# Altium PCB smart_pill_box.PcbDoc
Units mm, origin at the board's own origin, x right, y up, seen from the top; angles counter-clockwise.
Board outline 85 x 60 mm, 2 copper layers (Top Layer, Bottom Layer); 103 components, 78 nets, 376 pads, 0 vias.
Unrouted connection lines stored in the file: 227.
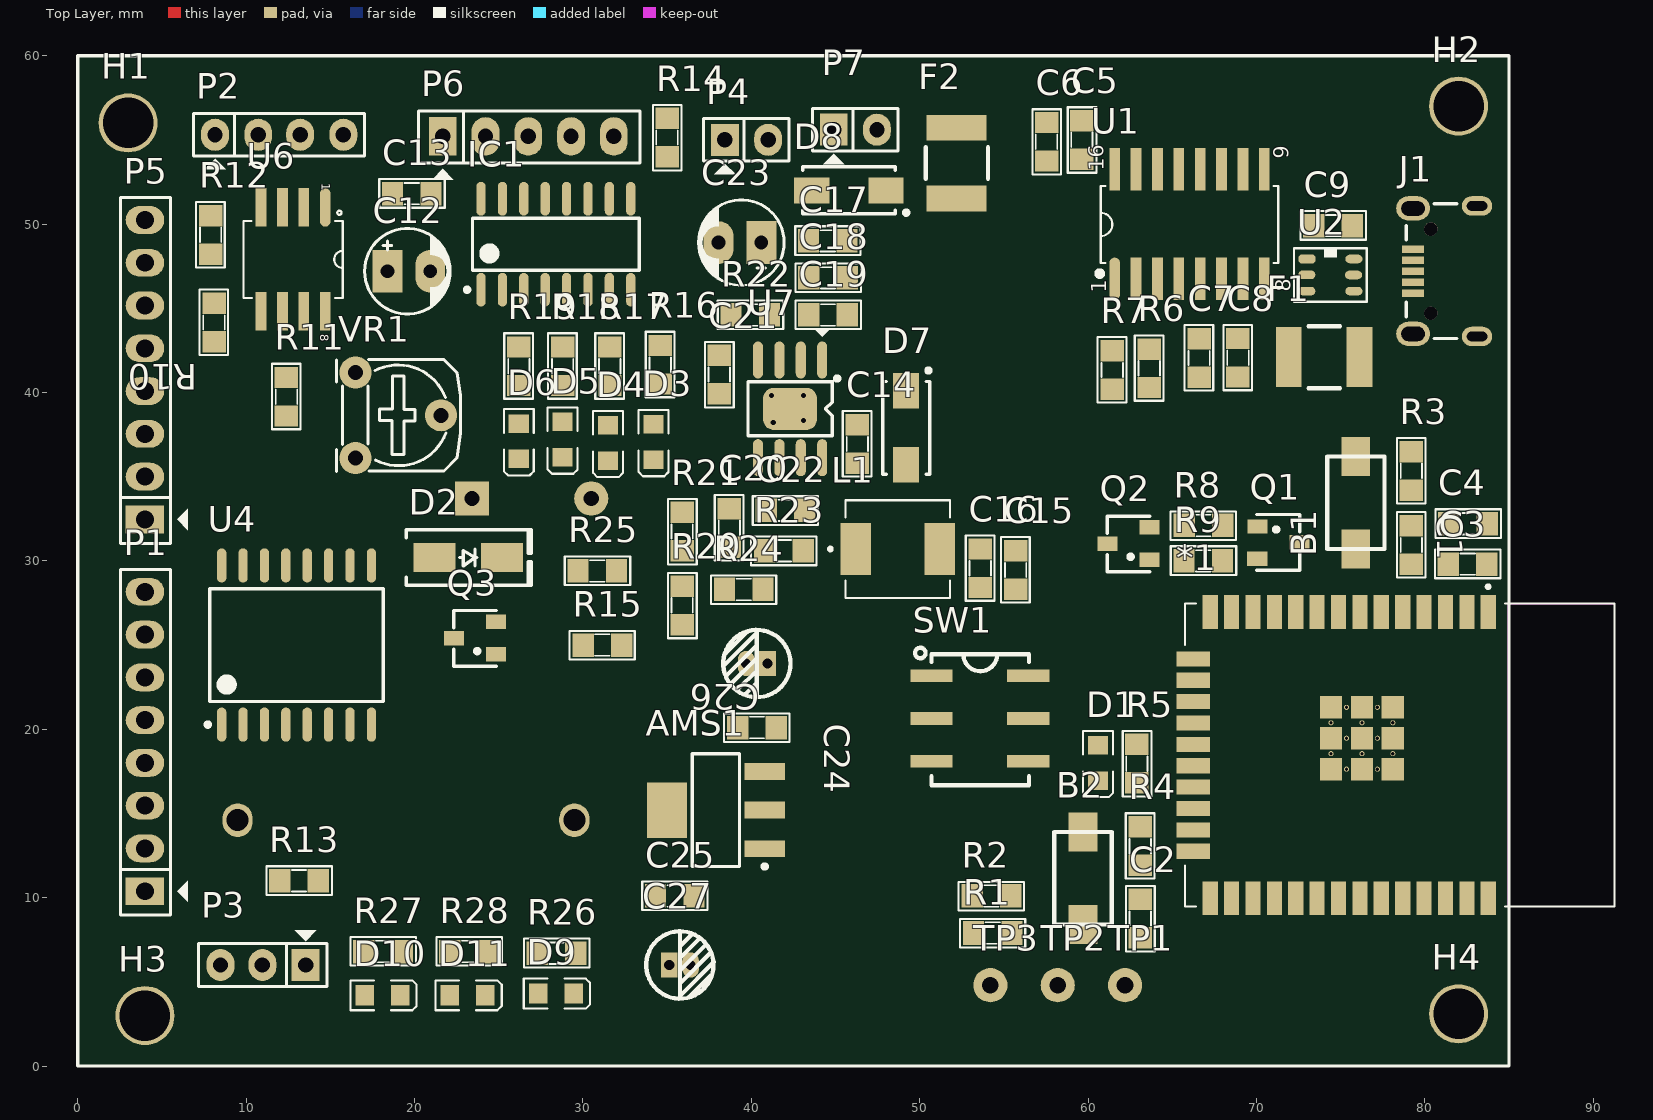
[diagram p0: Top Layer view]
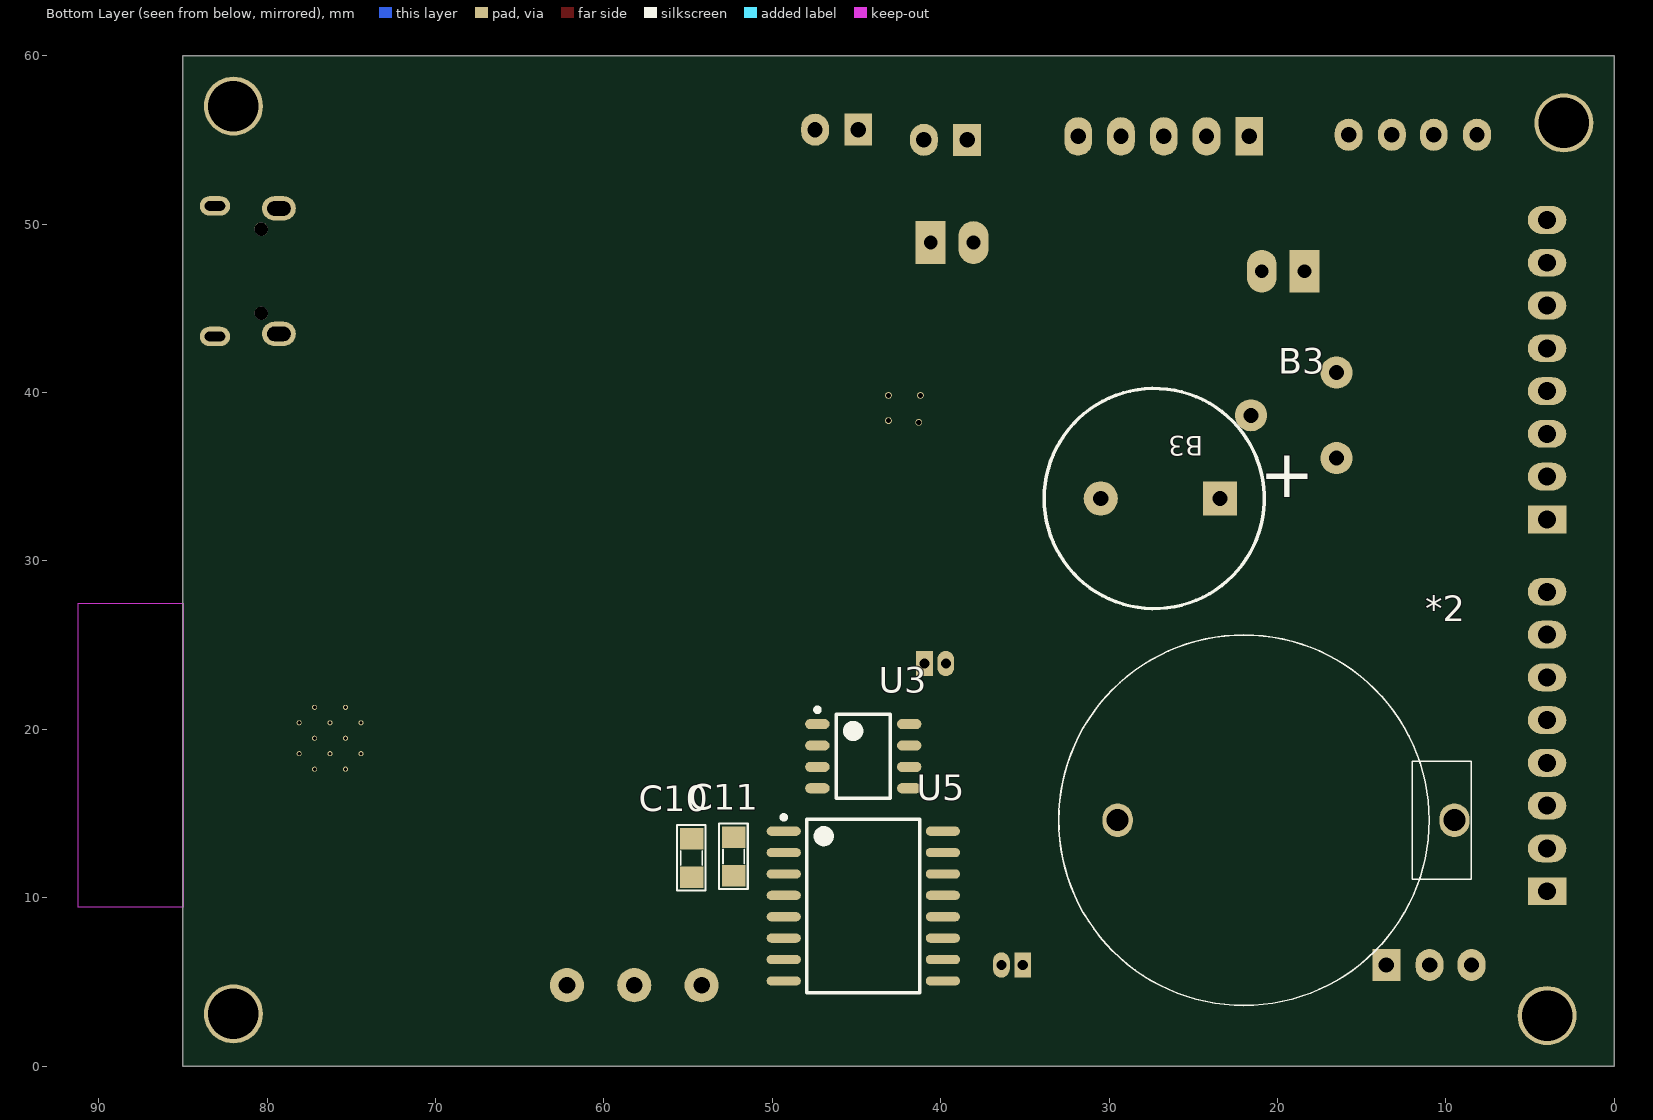
[diagram p1: Bottom Layer view, seen from below]

## Layer stack, top to bottom
Top Solder: solder mask 0.0102, Solder Resist, Dk 3.5
Top Layer: signal copper 0.0356
Dielectric 1: dielectric 0.32, FR-4, Dk 4.8
Bottom Layer: signal copper 0.0356
Bottom Solder: solder mask 0.0102, Solder Resist, Dk 3.5

## Board outline
0,0 85,0 85,60 0,60

## Design rules (kind name [scope] priority, off if disabled: settings)
Clearance [All] p1: gap=0.254 ignorepadtopadclearanceinfootprint=FALSE except(0: Arc-Hole Track-Hole SMDPad-Hole THPad-Hole Via-Hole Fill-Hole Poly-Hole Region-Hole Text-Hole)
DiffPairsRouting [All] p1: maxlimit=0.254 minlimit=0.254 mostfreqgap=0.254 toplayer_minwidth=0.381 toplayer_maxwidth=0.381 toplayer_prefwidth=0.381 bottomlayer_minwidth=0.381 bottomlayer_maxwidth=0.381 bottomlayer_prefwidth=0.381 maxuncoupledlength=12.7
PolygonConnect [All] p1: connectstyle=Relief reliefconductorwidth=0.254 reliefentries=4 polygonreliefangle="90 Angle" airgapwidth=0.254
RoutingVias [All] p1: holewidth=0.711 width=1.27 viastyle="Through Hole" minholewidth=0.711 minwidth=1.27 maxholewidth=0.711 maxwidth=1.27
SolderMaskExpansion [All] p1: expansion=0.102 istentingtop=FALSE
Width [All] p1: maxlimit=0.254 minlimit=0.254 preferedwidth=0.254
29 further rules are at their usual default settings.

## Classes and differential pairs
component class USB: C5 C6 C7 C8 C9 F1 J1 Q1 Q2 R6 R7 R8 R9 U1 U2
component class Power: AMS1 C14 C15 C16 C17 C18 C19 C20 C21 C22 C23 C25 C27 D7 D8 D9 D10 D11 F2 L1 P7 R20 R21 R22 R23 R24 R25 R26 R27 R28 SW1 U7
component class Output: B3 C12 C13 D2 D3 D4 D5 D6 IC1 P4 P5 P6 Q3 R14 R15 R16 R17 R18 R19
component class Input: *2 C10 C11 H1 H2 H3 H4 P1 P2 P3 R10 R11 R12 R13 U3 U4 U5 U6 VR1
component class ESP32: *1 B1 B2 C1 C2 C3 C4 D1 R1 R2 R3 R4 R5 TP1 TP2 TP3
differential pair D: +D_P -D_N

## Components (designator, comment, footprint, x,y, rotation, side; value= is the part's Value field where it differs from the comment)
*1 "ESP32 WROOM 32" ESP32-WROOM-32D 78.505,18.465 r270 top
*2 "CR-2032" CR-2032 22,14.6 r180 bottom
AMS1 "AMS1117-3.3V" SOT223 37.9,15.2 r90 top value="AMS1117-3.3V SOT223"
B1 "Button SMD 2 Pin 3x4mm" "BUTTON SMD 2 PIN" 75.9,30.7 r90 top
B2 "Button SMD 2 Pin 3x4mm" "BUTTON SMD 2 PIN" 59.7,8.4 r90 top
B3 "Buzzer" BUZZER 25.42,33.7 r0 bottom
C1 "Cap Non-Pol SMD" CAP-SM-0805 79.2,32.086 r270 top value=100nF/16V
C2 "Cap Non-Pol SMD" CAP-SM-0805 63.1,7.614 r90 top value=100nF/16V
C3 "Cap Non-Pol SMD" CAP-SM-0805 83.686,29.8 r180 top value=22uF/6.3V
C4 "Cap Non-Pol SMD" CAP-SM-0805 83.7,32.2 r180 top value=100nF/25V
C5 "Cap Non-Pol SMD" CAP-SM-0805 59.635,53.857 r90 top value=22uF/25V
C6 "Cap Non-Pol SMD" CAP-SM-0805 57.535,53.743 r90 top value=100nF/25V
C7 "Cap Non-Pol SMD" CAP-SM-0805 66.6,43.186 r270 top value=22uF/25V
C8 "Cap Non-Pol SMD" CAP-SM-0805 68.9,43.2 r270 top value=100nF/25V
C9 "Cap Non-Pol SMD" CAP-SM-0805 75.7,49.9 r180 top value=100nF/25V
C10 "Cap Non-Pol SMD" CAP-SM-0805 54.8,13.5 r270 bottom value=22uF/25V
C11 "Cap Non-Pol SMD" CAP-SM-0805 52.3,13.586 r270 bottom value=100nF/25V
C12 "Cap Pol" CP1/2 18.4,47.2 r0 top value=47uF
C13 "Cap Non-Pol SMD" CAP-SM-0805 20.986,51.8 r180 top value=0.1uF/25V
C14 "Cap Non-Pol SMD" CAP-SM-0805 46.3,38.086 r270 top value=0.1uF/16V
C15 "Cap Non-Pol SMD" CAP-SM-0805 55.7,30.6 r270 top value=33uF/6.3V
C16 "Cap Non-Pol SMD" CAP-SM-0805 53.6,30.7 r270 top value=33uF/6.3V
C17 "Cap Non-Pol SMD" CAP-SM-0805 45.686,49 r180 top value=4.7uF/50V
C18 "Cap Non-Pol SMD" CAP-SM-0805 45.7,46.8 r180 top value=4.7uF/50V
C19 "Cap Non-Pol SMD" CAP-SM-0805 45.7,44.6 r180 top value=10pF/50V
C20 "Cap Non-Pol SMD" CAP-SM-0805 38.7,33.1 r270 top value=4.7nF/50V
C21 "Cap Non-Pol SMD" CAP-SM-0805 38.1,39.914 r90 top value=10nF/50V
C22 "Cap Non-Pol SMD" CAP-SM-0805 40.9,33 r0 top value=39pF/50V
C23 "Cap Pol" CP1/2 40.6,48.9 r180 top value=100pF
C24 "Cap Non-Pol SMD" CAP-SM-0805 39.2,20.1 r0 top value=1uF/50V
C25 "Cap Non-Pol SMD" CAP-SM-0805 36.6,10.1 r180 top value=1uF/50V
C26 "10uF" "tu hoa 4mm" 40.335,23.9 r180 top
C27 "10uF" "tu hoa 4mm" 35.765,6 r0 top
D1 "LED SMD" LED_0805_Blue 60.6,18 r270 top
D2 "SS34" "DIODE SMA" 23.2,30.2 r0 top
D3 "LED SMD" LED_0805_Blue 34.2,37.05 r270 top
D4 "LED SMD" LED_0805_Blue 31.5,37 r270 top
D5 "LED SMD" LED_0805_Blue 28.8,37.2 r270 top
D6 "LED SMD" LED_0805_Blue 26.2,37.1 r270 top
D7 "D Schottky" SS34 49.2,37.9 r270 top
D8 "D Schottky" SS34 45.8,52 r180 top
D9 "LED SMD" LED_0805_Blue 28.4,4.3 r0 top
D10 "LED SMD" LED_0805_Blue 18.1,4.2 r0 top
D11 "LED SMD" LED_0805_Blue 23.15,4.2 r0 top
F1 "6V, 1.5A" Fuse_SMD_1812 74,42.1 r180 top value="24V, 1.5A"
F2 "16V, 1.5A" Fuse_SMD_1812 52.2,53.6 r270 top value="24V, 1.5A"
H1 "Hole" "LO KHOAN 3MM" 3,56 r0 top
H2 "Hole" "LO KHOAN 3MM" 82,57 r0 top
H3 "Hole" "LO KHOAN 3MM" 4,3 r0 top
H4 "Hole" "LO KHOAN 3MM" 82,3.1 r0 top
IC1 "ULN2003" "SOP 16" 28.4,48.8 r90 top
J1 "Micro USB 2.0 Type B" 629105150521 82.2,47.2 r90 top
L1 "6.8uH/4.4A" "CUON CAM SMD 0530" 48.7,30.7 r0 top
P1 "Header 8" JP8 4,10.38 r90 top
P2 "Header 4" JP4 10.7,55.3 r0 top
P3 "HALL SENSOR" JP3 11,6 r180 top
P4 "Header 2" JP2 38.435,55 r0 top
P5 "Header 8" JP8 4,32.46 r90 top
P6 "Header 5" JP5 21.68,55.2 r0 top
P7 "Header 2" JP2 44.9,55.6 r0 top
Q1 "BC817" SOT-23 71.3,31.1 r270 top value=C9014
Q2 "BC817" SOT-23 62.4,31 r90 top value=C9014
Q3 "HF" SOT-23 23.6,25.4 r90 top value=C9014
R1 "RESISTOR SMD" RES-SM-0805 53.2,7.9 r0 top value=10K/1%
R2 "RESISTOR SMD" RES-SM-0805 53.114,10.1 r0 top value=10K/1%
R3 "RESISTOR SMD" RES-SM-0805 79.2,36.486 r270 top value=10K/1%
R4 "RESISTOR SMD" RES-SM-0805 63.1,14.2 r270 top value=10K/1%
R5 "RESISTOR SMD" RES-SM-0805 62.9,16.814 r90 top value=1k/1%
R6 "RESISTOR SMD" RES-SM-0805 63.635,42.575 r270 top value=22/1%
R7 "RESISTOR SMD" RES-SM-0805 61.435,42.475 r270 top value=22/1%
R8 "RESISTOR SMD" RES-SM-0805 65.714,32.1 r0 top value=10K/1%
R9 "RESISTOR SMD" RES-SM-0805 67.986,30 r180 top value=10K/1%
R10 "RESISTOR SMD" RES-SM-0805 8.1,45.3 r270 top value=10k/1%
R11 "RESISTOR SMD" RES-SM-0805 12.4,40.886 r270 top value=10k/1%
R12 "RESISTOR SMD" RES-SM-0805 7.9,50.5 r270 top value=330/1%
R13 "RESISTOR SMD" RES-SM-0805 14.286,11 r180 top value=10k/1%
R14 "RESISTOR SMD" RES-SM-0805 35,54 r90 top value=1k/1%
R15 "RESISTOR SMD" RES-SM-0805 30.014,25 r0 top value=10K/1%
R16 "RESISTOR SMD" RES-SM-0805 34.6,42.786 r270 top value=1k/1%
R17 "RESISTOR SMD" RES-SM-0805 31.6,42.7 r270 top value=1k/1%
R18 "RESISTOR SMD" RES-SM-0805 28.8,42.7 r270 top value=1k/1%
R19 "RESISTOR SMD" RES-SM-0805 26.2,42.7 r270 top value=1k/1%
R20 "RESISTOR SMD" RES-SM-0805 35.9,26.214 r90 top value=2.49k/1%
R21 "RESISTOR SMD" RES-SM-0805 35.9,30.6 r90 top value=49.9k/1%
R22 "RESISTOR SMD" RES-SM-0805 41.086,44.6 r180 top value=100K/1%
R23 "RESISTOR SMD" RES-SM-0805 40.8,30.6 r0 top value=30K/1%
R24 "RESISTOR SMD" RES-SM-0805 38.414,28.3 r0 top value=10k/1%
R25 "RESISTOR SMD" RES-SM-0805 32,29.4 r180 top value=20K/1%
R26 "RESISTOR SMD" RES-SM-0805 29.586,6.7 r180 top value=1k/1%
R27 "RESISTOR SMD" RES-SM-0805 19.286,6.8 r180 top value=1k/1%
R28 "RESISTOR SMD" RES-SM-0805 24.386,6.8 r180 top value=1k/1%
SW1 "2P2T - DPDT" SW_2P2T-DPDT_SMD 50.7,23.18 r270 top
TP1 "Test Point" TP 62.2,4.8 r0 top
TP2 "Test Point" TP 58.2,4.8 r0 top
TP3 "Test Point" TP 54.2,4.8 r0 top
U1 "CH340C" SOIC16_50_284_25X90_SMT 66,50 r90 top
U2 "USBLC6-2SC6 TVS" SOT23-6 74.5,47.1 r0 top
U3 "AT24C32" LM555CMX 44.6,18.4 r180 bottom value=LM555CMX
U4 "PCF8574" "SOIC 16" 13,25 r90 top
U5 "DS3231 SMD" "SOIC 16" 44.6,9.5 r180 bottom
U6 "LM393DT" SOIC8_50_328_25X90_SMT 12.8,47.9 r270 top
U7 "TPS54331" "SO-8 TSP5430D" 42.307,39.024 r270 top
VR1 "10K" "Bien Tro Tam Giac Dung" 16.5,41.18 r270 top

## Footprints (in the part's own frame and the unit in brackets; to place one, negate y for a bottom-side part, rotate by r counter-clockwise, add the part's x,y. Pads: shape width x height; smd on the part's side, far side on the other; paste and mask are expansions set on the pad)
629105150521 [mm] "Micro USB 2.0 SMT Type B Horizontal 5 Contacts High Current"
  rect 0.45x1.3 smd: 1(-1.3,2.9) 2(-0.65,2.9) 3(0,2.9) 4(0.65,2.9) 5(1.3,2.9)
  round 0.8 hole 0.8 unplated: MH1(-2.5,1.85) MH2(2.5,1.85)
  oval 1.15x1.8 hole 0.55 slot 1.2 at 90 deg: Shell(-3.875,-0.9) Shell(3.875,-0.9)
  oval 1.45x2 hole 0.85 slot 1.4 at 90 deg: Shell(-3.725,2.9) Shell(3.725,2.9)
  silkscreen extent -4,0.3 4,3.3, body extent -4,-3.3 4,3.3, height 2.75
"Bien Tro Tam Giac Dung" [mil] "RM065"
  round 75 hole 35: 1(0,0) 2(100,200) 3(200,0)
  silkscreen extent -31,-44 231,246, body extent -28,-50 228,228, height 279
"BUTTON SMD 2 PIN" [mm] "Button SMD 2 Pin 3x4mm"
  rect 2.3x1.7 smd: 1(0,0) 2(5.5,0)
  silkscreen extent 0,-1.7 5.5,1.7, body extent 0.24,-1.48 5.24,1.42, height 2
BUZZER [mil]
  rect 80x80 hole 36: 1(-78.73,0)
  round 80 hole 36: 2(200,0)
  silkscreen extent -182,-257 332,257
CAP-SM-0805 [mil]
  rect 50x55 smd: 1(0,0) 2(90,0)
  silkscreen extent -32,-34 121,33, body extent 6,-25 84,25, height 31
CP1/2 [mil] "Tu hoa < 22uF/16>50V"
  rect 70x100 hole 32: 1(0,0)
  oval 70x100 hole 32: 2(100,0)
  silkscreen extent -53,-100 147,100, body extent -49,-99 149,99, height 287
CR-2032 [mm] "CR-2032 Holder"
  oval 1.8x2 hole 1.3: 1(-7.5,0) 2(12.5,0)
  silkscreen extent -11,-11 13.5,11, body extent -11,-11 13.5,11, height 8.51
"CUON CAM SMD 0530" [mm] "CUON CAM SMD 0530"
  rect 1.8x3.1 smd: 1(-2.5,0) 2(2.5,0)
  silkscreen extent -4.1,-2.9 3.1,2.9, body extent -3.1,-2.88 3.1,2.92, height 3
"DIODE SMA" [mm] "SMA"
  rect 2.5x1.7 smd: 1(-2,0) 2(2,0)
  silkscreen extent -3.68,-1.65 3.75,1.65, body extent -2.6,-1.37 2.6,1.37, height 2.4
ESP32-WROOM-32D [mm]
  rect 2x0.9 smd: 1(-8.5,5.26) 2(-8.5,3.99) 3(-8.5,2.72) 4(-8.5,1.45) 5(-8.5,0.18) 6(-8.5,-1.09) 7(-8.5,-2.36) 8(-8.5,-3.63) 9(-8.5,-4.9) 10(-8.5,-6.17) 11(-8.5,-7.44) 12(-8.5,-8.71) 13(-8.5,-9.98) 14(-8.5,-11.25) 25(8.5,-11.25) 26(8.5,-9.98) 27(8.5,-8.71) 28(8.5,-7.44) 29(8.5,-6.17) 30(8.5,-4.9) 31(8.5,-3.63) 32(8.5,-2.36) 33(8.5,-1.09) 34(8.5,0.18) 35(8.5,1.45) 36(8.5,2.72) 37(8.5,3.99) 38(8.5,5.26)
  rect 0.9x2 smd: 15(-5.715,-12.25) 16(-4.445,-12.25) 17(-3.175,-12.25) 18(-1.905,-12.25) 19(-0.635,-12.25) 20(0.635,-12.25) 21(1.905,-12.25) 22(3.175,-12.25) 23(4.445,-12.25) 24(5.715,-12.25)
  rect 1.33x1.33 smd: 39(-2.835,-0.405) 39(-2.835,-2.24) 39(-2.835,-4.075) 39(-1,-0.405) 39(-1,-2.24) 39(-1,-4.075) 39(0.835,-0.405) 39(0.835,-2.24) 39(0.835,-4.075)
  round 0.3 hole 0.2: 39(-2.835,-1.322) 39(-2.835,-3.157) 39(-1.917,-0.405) 39(-1.917,-2.24) 39(-1.917,-4.075) 39(-1,-1.322) 39(-1,-3.157) 39(-0.082,-0.405) 39(-0.082,-2.24) 39(-0.082,-4.075) 39(0.835,-1.322) 39(0.835,-3.157)
  Keep-Out Layer region: 9,6.45 -9,6.45 -9,12.75 9,12.75
  Keep-Out Layer region: 9,6.45 -9,6.45 -9,12.75 9,12.75
  silkscreen extent -10.1,-12.75 9,12.75, body extent -9,-12.62 9,12.88, height 3.2
Fuse_SMD_1812 [mil] "Fuse SMD, size 1812"
  rect 60x140 smd: 0(-83.41,0) 1(82,0)
  silkscreen extent -38,-72 36,73, body extent -93,-67 93,67, height 18
JP2 [mil]
  rect 65x75 hole 36: 1(0,0)
  oval 65x75 hole 36: 2(101,0)
  silkscreen extent -50,-81 150,50, body extent -48,-50 148,48, height 323
JP3 [mil] "Jumper 3"
  rect 65x75 hole 36: 1(-100,0)
  oval 65x75 hole 36: 2(1,0) 3(99,0)
  silkscreen extent -150,-81 150,50, body extent -150,-60 150,55, height 355
JP4 [mil] "Jumper 4"
  oval 65x75 hole 36: 1(-100,0) 2(1,0) 3(99,0) 4(200,0)
  silkscreen extent -150,-81 250,50, body extent -148,-48 248,50, height 323
JP5 [mil] "JP5"
  rect 65x90 hole 36: 1(0,0)
  oval 65x90 hole 36: 2(100,0) 3(200,0) 4(300,0) 5(400,0)
  silkscreen extent -57,-101 461,60, body extent -48,-53 448,45, height 323
JP8 [mil] "JP8"
  rect 65x90 hole 42: 1(0,0)
  oval 65x90 hole 42: 2(100,0) 3(200,0) 4(300,0) 5(400,0) 6(500,0) 7(600,0) 8(700,0)
  silkscreen extent -56,-100 752,57, body extent -48,-50 748,48, height 323
LED_0805_Blue [mm] "Chip LED, 2-Leads, Body 2.0x1.3mm, IPC Medium Density"
  rect 1.1x1.2 smd: 1(-1.05,0) 2(1.05,0)
  silkscreen extent -1.91,-0.89 2.03,0.89, body extent -1,-0.63 1,0.62, height 0.68
LM555CMX [mm] "SOIC, 8-Leads, Body 4.91x3.90mm, Pitch 1.27mm, IPC Medium Density"
  oval 1.45x0.6 smd: 1(-2.725,1.905) 2(-2.725,0.635) 3(-2.725,-0.635) 4(-2.725,-1.905) 5(2.725,-1.905) 6(2.725,-0.635) 7(2.725,0.635) 8(2.725,1.905)
  silkscreen extent -2.85,-2.5 1.6,2.88, body extent -3,-2.5 3,2.5, height 1.35
"LO KHOAN 3MM" [mil]
  round 138 hole 118.1: 1(0,0)
RES-SM-0805 [mil]
  rect 50x55 smd: 1(0,0) 2(90,0)
  silkscreen extent -32,-34 121,33, body extent 6,-25 84,25, height 31
"SO-8 TSP5430D" [mm] "8-Pin Small Outline Integrated Circuit 1.27 mm Pitch, IPC Medium Density"
  oval 2.2x0.6 smd: 1(-2.9,1.905) 2(-2.9,0.635) 3(-2.9,-0.635) 4(-2.9,-1.905) 5(2.9,-1.905) 6(2.9,-0.635) 7(2.9,0.635) 8(2.9,1.905)
  round 0.4 hole 0.3: 9(-0.8,0.8) 9(-0.8,-1.1) 9(0.7,0.8) 9(0.8,-1)
  rrect50% 2.5x3.2 smd: 9(0,0)
  silkscreen extent -4.8,-2.5 1.6,2.93, body extent -2.89,-2.43 3.15,2.59, height 1.6
SOIC8_50_328_25X90_SMT [mil] "SOIC"
  oval 90x25 smd mask+3: 1(-121.32,75)
  rect 90x25 smd mask+3: 2(-121.32,25) 3(-121.32,-25) 4(-121.32,-75) 5(121.32,-75) 6(121.32,-25) 7(121.32,25) 8(121.32,75)
  silkscreen extent -114,-116 90,116, body extent -121,-98 121,98, height 79
SOIC16_50_284_25X90_SMT [mm]
  oval 2.5x0.635 smd mask+0.076: 1(-3.25,4.42)
  rect 2.5x0.635 smd mask+0.076: 2(-3.25,3.15) 3(-3.25,1.88) 4(-3.25,0.61) 5(-3.25,-0.66) 6(-3.25,-1.93) 7(-3.25,-3.2) 8(-3.25,-4.47) 9(3.25,-4.47) 10(3.25,-3.2) 11(3.25,-1.93) 12(3.25,-0.66) 13(3.25,0.61) 14(3.25,1.88) 15(3.25,3.15) 16(3.25,4.42)
  silkscreen extent -3.07,-5.3 2.26,5.44, body extent -3.02,-4.97 2.98,4.93, height 1.4
"SOIC 16" [mm] "SOIC, 16-Leads, Body 10.30x7.50mm, Pitch 1.27mm, IPC Medium Density"
  oval 2.032x0.55 smd: 1(-4.725,4.445) 2(-4.725,3.175) 3(-4.725,1.905) 4(-4.725,0.635) 5(-4.725,-0.635) 6(-4.725,-1.905) 7(-4.725,-3.175) 8(-4.725,-4.445) 9(4.725,-4.445) 10(4.725,-3.175) 11(4.725,-1.905) 12(4.725,-0.635) 13(4.725,0.635) 14(4.725,1.905) 15(4.725,3.175) 16(4.725,4.445)
  silkscreen extent -4.85,-5.15 3.35,5.39, body extent -5.15,-5.17 5.16,5.16, height 2.48
"SOP 16" [mm] "SOIC, 16-Leads, Body 9.90x3.91mm, Pitch 1.27mm, IPC Medium Density"
  oval 2x0.55 smd: 1(-2.7,4.445) 2(-2.7,3.175) 3(-2.7,1.905) 4(-2.7,0.635) 5(-2.7,-0.635) 6(-2.7,-1.905) 7(-2.7,-3.175) 8(-2.7,-4.445) 9(2.7,-4.445) 10(2.7,-3.175) 11(2.7,-1.905) 12(2.7,-0.635) 13(2.7,0.635) 14(2.7,1.905) 15(2.7,3.175) 16(2.7,4.445)
  silkscreen extent -2.82,-4.95 1.55,5.39, body extent -3,-4.95 3,4.95, height 1.4
SOT23-6 [mil]
  oct 40x20 smd: 1(-59.41,32.4)
  oval 40x20 smd: 2(-59.41,-4.6) 3(-59.41,-42.6) 4(50.59,-42.6) 5(50,-5) 6(50.59,32.4)
  silkscreen extent -89,-68 81,57, body extent -64,-64 54,54, height 51
SOT223 [mm]
  rect 1x2.4 smd: 1(-2.3,-2.9) 2(0,-2.9) 3(2.3,-2.9)
  rect 3.3x2.4 smd: 4(0,2.9)
  silkscreen extent -3.47,-3.03 3.35,1.4, body extent -3.25,-3.56 3.25,3.4, height 1.68
SOT-23 [mm] "SOT 23 _ 1-3-2"
  rect 0.85x1.2 smd: 1(-0.94,-1.245) 2(0.985,-1.25) 3(0.005,1.25)
  silkscreen extent -1.65,-1.27 1.65,1.27, body extent -1.47,-1.33 1.53,1.17, height 1.06
SS34 [mm] "DO-214-AC/SMA Molded Diode, Body 5.3x2.6mm, IPC Medium Density"
  rect 2.1x1.55 smd: 1(-2.2,0) 2(2.2,0)
  silkscreen extent -3.52,-1.4 2.75,1.45, body extent -2.75,-1.42 2.75,1.38, height 2.3
SW_2P2T-DPDT_SMD [mm] "PCB Mountable Slide Switch. Double Pole, Double Throw = DPDT"
  rect 0.75x2.5 smd: 1(0,0) 2(2.54,0) 3(5.08,0) 4(5.08,5.75) 5(2.54,5.75) 6(0,5.75)
  silkscreen extent -1.66,-0.97 6.5,5.8, body extent -0.96,-0.61 6.04,6.43, height 10.92
TP [mil] "Connect 1"
  round 80 hole 39: TP1(0,0)
  body extent -50,-50 50,50, height 179
"tu hoa 4mm" [mm]
  rect 1x1.5 hole 0.6: 1(-0.635,0)
  oval 1x1.5 hole 0.6: 2(0.635,0)
  silkscreen extent -2,-2 2.01,2.01, body extent -2.47,-2.47 2.58,2.58, height 14.81

## Part data
AMS1: library part "AMS1117 SMD", "Dán", Chung_Loai=Dán, Don_Vi=Con, Ma_Hang=MH000596
B1 B2: library part BUTTON
C1 C2 C3 C4 C5 C6 C7 C8 C9 C10 C11 C13 C14 C15 C16 C17 C18 C19 C20 C21 C22 C24 C25: "Capacitor"
C12 C23: "Polarized Capacitor (Radial)"
C26 C27: library part "Tu Hoa 10uF 25V 4x7", "Cắm", Chung_Loai=Cắm, Don_Vi=Con, Ma_Hang=MH001349, So_Chan=2, Ten_Linh_Kien="Tụ Hóa 10uF 25V 4x7MM"
D1 D3 D4 D5 D6 D9 D10 D11: "LED"
D2: library part "Diode SS34 ( 1N5822 )", "Dán", Chung_Loai=Dán, Don_Vi=Con, Ma_Hang=MH002104, Ten_Linh_Kien="Diode SS34 3A 40V SMA ( 1N5822 SS34A)"
D7 D8: "Schottky Diode", Code_JEDEC=DO-214-AA, LatestRevisionDate=17-Jul-2002, LatestRevisionNote="Re-released for DXP Platform.", PackageDescription="DO-214-AA/SMB; 2 C-Bend Leads; Body 5.3 x 3.6 mm, inc. leads (LxW)", PackageReference=SMB, Published=8-Jun-2000, Publisher="Altium Limited"
F1 F2: library part 061812150024, "Resettable Fuse, Size 1812, 24V, 1.5A", Hold Current=1.5A, Manufacturer=Littelfuse, Threshold Current=20A, Threshold Voltage=24V, Trip Current=3A, ComponentLink1Description="Datasheet link", ComponentLink1URL=https://www.littelfuse.com/~/media/electronics/product_specifications/resettable_ptcs/littelfuse_ptc_minismdc300f_2_product_specification.pdf.pdf, ComponentLink2Description="Supplier 1 URL", ComponentLink2URL=https://www.mouser.vn/ProductDetail/Littelfuse/MINISMDC150F-24-2?qs=F6FIpiMdEVZ%2Fp37J%2FDHAxA%3D%3D, ComponentLink3Description="Supplier 2 URL", ComponentLink3URL=https://www.digikey.com/en/products/detail/littelfuse-inc/MINISMDC150F-24-2/1113513?s=N4IgTCBcDaILIEkByCDKcAiBhAjAVgAYAxAejABYBaCAXQF8g, ComponentLink4Description="Supplier 3 URL", ComponentLink4URL=https://www.thegioiic.com/cau-chi-tu-phuc-hoi-1812-24v-1-5a, Mounting Technology=SMT/SMD, Size=1812, Supplier 1 Name=Mouser, Supplier 1 SN=650-MINISMDC150F/24, Supplier 1 URL=https://www.mouser.vn/ProductDetail/Littelfuse/MINISMDC150F-24-2?qs=F6FIpiMdEVZ%2Fp37J%2FDHAxA%3D%3D, Supplier 2 Name=Digi-Key, Supplier 2 SN=MINISMDC150F24-2TR-ND, Supplier 2 URL=https://www.mouser.vn/ProductDetail/Littelfuse/MINISMDC150F-24-2?qs=F6FIpiMdEVZ%2Fp37J%2FDHAxA%3D%3D, Supplier 3 Name=thegioiic, Supplier 3 SN=N/A, Supplier 3 URL=https://www.thegioiic.com/cau-chi-tu-phuc-hoi-1812-24v-1-5a
H1 H2 H3 H4: "Hole 3mm"
IC1: library part "ULN2003A SMD", "Dán", Chung_Loai=Dán, Don_Vi=Con, Ma_Hang=MH002408, Ten_Linh_Kien="ULN2003 SOP16"
J1: library part 629105150521, "Micro USB 2.0 Type B Receptacle WR-COM, Horizontal, SMT, with Pegs, High Current at Pin 1 & Pin 5", Contact Resistance="30 mOhm", Operating Temperature="-40 to 85 degC", Rated Current="3 A", Working Voltage="30 VAC", ComponentLink1Description=Datasheet, ComponentLink1URL=https://katalog.we-online.de/em/datasheet/629105150521.pdf, ComponentLink2Description="Supplier 1 URL", ComponentLink2URL=N/A, ComponentLink3Description="Supplier 2 URL", ComponentLink3URL=N/A, ComponentLink4Description="Supplier 3 URL", ComponentLink4URL=N/A, Connector Type="Micro USB 2.0 Type B", Gender=Receptacle, Mounting Technology=SMT, Orientation=Horizontal, Packaging="Tape and Reel", Part Number=629105150521, Published Date="September 2018", Publisher="Wurth Elektronik", Supplier 1 Name=Mouser, Supplier 1 SN=710-629105150521, Supplier 1 URL=https://www.mouser.vn/ProductDetail/Wurth-Elektronik/629105150521?qs=a9WhcLg8qCzXiH7kZP8GRQ%3D%3D, Supplier 2 Name=Digi-Key, Supplier 2 SN=N/A, Supplier 2 URL=N/A, Supplier 3 Name=thegioiic, Supplier 3 SN=N/A, Supplier 3 URL=N/A
L1: library part "Cuon Cam SMD 0530", "SMD 0530", Package=None, Availability=Unavailable, MP=FDV0530-H-1R5M=P3, Price=None
P1 P5: "Header, 8-Pin", LatestRevisionDate=17-Jul-2002, LatestRevisionNote="Re-released for DXP Platform.", Publisher="Altium Limited"
P2: "Header, 4-Pin", LatestRevisionDate=17-Jul-2002, LatestRevisionNote="Re-released for DXP Platform.", Publisher="Altium Limited"
P3: library part "Header 3", "Header, 3-Pin", LatestRevisionDate=17-Jul-2002, LatestRevisionNote="Re-released for DXP Platform.", Publisher="Altium Limited"
P4 P7: "Header, 2-Pin", LatestRevisionDate=17-Jul-2002, LatestRevisionNote="Re-released for DXP Platform.", Publisher="Altium Limited"
P6: "Header, 5-Pin", LatestRevisionDate=17-Jul-2002, LatestRevisionNote="Re-released for DXP Platform.", Publisher="Altium Limited"
Q1 Q2: library part "Trans BC817", "SOT-23 - C8658"
Q3: library part "Trans C1815 HF SMD", "SOT-23"
R1 R2 R3 R4 R5 R6 R7 R8 R9 R10 R11 R12 R13 R14 R15 R16 R17 R18 R19 R20 R21 R22 R23 R24 R25 R26 R27 R28: "Resistor"
SW1: library part "SW2_0.3A-2P2T- DPDT-SMD", "PCB Mountable Slide Switch. Double Pole, Double Throw = DPDT", Alternate Part Number-1=NA, Case/Package=SMD, Supplier Part Number-1=5261, Manufacturer=NA, Manufacturer Part Number=NA, Supplier-1=Sunrom
U1: "USB Bridge, USB to UART USB 2.0 UART Interface", Alternate Part Number-1=NA, Case/Package=SOIC16, Manufacturer=Olimex, Supplier Part Number-1=C84681, Manufacturer Part Number=CH340C, Supplier-1=LCSC
U2: library part IC_LTC6992IS6-1, "Oscillator, Silicon IC 3.81Hz ~ 1MHz TSOT-23-6", Alternate Part Number-1=NA, Case/Package=SOT-23-6, Manufacturer="Linear Technology/Analog Devices", Manufacturer Part Number=LTC6992IS6-1, Supplier Part Number-1=LTC6992IS6-1#TRMPBF, Supplier-1=Arrow
U3: library part LM555CMX, "Timers & Support Products TIMER", LCSC Part #=N/A, Manufacturer="Texas Instruments", Manufacturer Part Number=LM555CMX/NOPB, Operating Temperature Max="+ 85 C", Operating Temperature Min="- 40 C", Package / Case=SOIC-8, Power Dissipation="1.18 W", Supplier 1 Part Number=926-LM555CMX/NOPB, Supplier 3 Part Number=NE555D, Supply Voltage - Max="4.5 V", Supply Voltage - Min="16 V", Active=Active, ComponentLink1Description=Datasheet, ComponentLink1URL=https://www.ti.com/lit/gpn/lm555, Mount=SMD/SMT, Number of Internal Timers=1, Packaging="Tape and Reel", Pad count=8, Supplier 1=Mouser, Supplier 1 URL=https://www.mouser.com/ProductDetail/Texas-Instruments/LM555CMX-NOPB?qs=QbsRYf82W3GHnQuoL%2FmIoA%3D%3D, Supplier 2=Digi-Key, Supplier 2 Part Number=N/A, Supplier 2 URL=N/A, Supplier 3=thegioiic, Supplier 3 URL=https://www.thegioiic.com/ne555d-ic-timer-circuit-100khz-8-soic
U4: library part "DS3231 SMD", "SOIC"
U5: "SOIC"
U6: library part IC_LM393DT, "Comparator General Purpose CMOS, DTL, ECL, MOS, Open-Collector, TTL 8-SO", Alternate Part Number-1=NA, Case/Package=SOIC8, Manufacturer="Texas Instruments", Manufacturer Part Number=LM393DT, Supplier Part Number-1=LM393DT, Supplier-1=ARROW
VR1: library part "Bien tro tam giac 10K Dung", "Cắm", Chung_Loai=Cắm, Don_Vi=Con, Ma_Hang=MH000919, Ten_Linh_Kien="Biến Trở Tam Giác 103-10K RM065 (Chân Đứng)"

## Nets (pads, with @x,y where several pads share a name; then routed paths per layer and width w, separated by ;. In a path a pad name is that pad's centre, name@x,y a point inside that pad or via, vN(x,y) a via of type N, cw(c..) or ccw(c..) an arc to the next point about the centre after c; other vN are vias at no path point)
+3.3V: *1.2 AMS1.2 AMS1.4 B3.1 C3.2 C4.2 C5.1 C6.1 C10.1 C11.1 C25.2 C27.1 D2.2 P5.7 R1.1 R2.1 R3.1 R4.1 R10.2 R11.2 R12.2 R13.2 R27.1 U1.4 U1.16 U3.8 U4.16 U5.2 U6.8 VR1.3
+5V: AMS1.3 C12.1 C13.2 C24.2 C26.1 IC1.9 P3.1 P6.1 R16.1 R17.1 R18.1 R19.1 R26.1 SW1.2 SW1.5
C1_KEYPAD: P1.5 U4.9
C2_KEYPAD: P1.6 U4.10
C3_KEYPAD: P1.7 U4.11
C4_KEYPAD: P1.8 U4.12
D_N: U1.6 U2.3
D_P: U1.5 U2.1
DTR: Q2.2 R7.2 R8.1
GND: *1.1 *1.15 *1.38 *2.2 AMS1.1 B1.1 B2.1 C1.1 C2.1 C3.1 C4.1 C5.2 C6.2 C7.2 C8.2 C9.1 C10.2 C11.2 C12.2 C13.1 C15.2 C16.2 C17.1 C18.1 C19.1 C21.1 C22.2 C23.2 C24.1 C25.1 C26.2 C27.2 D1.2 D7.1 D9.2 D10.2 D11.2 IC1.8 J1.5 J1.Shell P2.2 P2.4 P3.3 P4.2 P5.8 P7.1 Q3.2 R23.2 R24.2 R25.2 U1.1 U2.2 U3.1 U3.2 U3.3 U3.4 U3.7 U4.1 U4.2 U4.3 U4.8 U5.13 U6.4 U7.7 VR1.1
LED_STATUS: *1.24 R5.1
Net*1_3: *1.3 B1.2 C1.2 Q1.3 R3.2
Net*1_6: *1.6 R11.1 U6.1
Net*1_7: *1.7 P3.2 R13.1
Net*1_8: *1.8 TP1.TP1
Net*1_9: *1.9 TP2.TP1
Net*1_10: *1.10 TP3.TP1
Net*1_11: *1.11 IC1.4
Net*1_12: *1.12 IC1.3
Net*1_13: *1.13 P5.1
Net*1_14: *1.14 IC1.1
Net*1_16: *1.16 P5.4
Net*1_25: *1.25 B2.2 C2.2 Q2.3 R4.2
Net*1_26: *1.26 P5.3
Net*1_27: *1.27 R15.1
Net*1_28: *1.28 IC1.2
Net*1_29: *1.29 P5.2
Net*1_30: *1.30 P5.6
Net*1_31: *1.31 R14.1
Net*1_33: *1.33 R2.2 U3.5 U4.15 U5.15
Net*1_34: *1.34 U1.2
Net*1_35: *1.35 U1.3
Net*1_36: *1.36 R1.2 U3.6 U4.14 U5.16
Net*1_37: *1.37 P5.5
Net*2_1: *2.1 U5.14
NetB3_2: B3.2 D2.1 Q3.3
NetC7_1: C7.1 C8.1 C9.2 F1.1 SW1.3 SW1.4 U2.5
NetC14_1: C14.1 U7.1
NetC14_2: C14.2 D7.2 L1.1 U7.8
NetC20_1: C20.1 C22.1 U7.6
NetC20_2: C20.2 R23.1
NetC21_2: C21.2 U7.4
NetD1_1: D1.1 R5.2
NetD3_1: D3.1 R16.2
NetD3_2: D3.2 IC1.16 P6.2
NetD4_1: D4.1 R17.2
NetD4_2: D4.2 IC1.15 P6.3
NetD5_1: D5.1 R18.2
NetD5_2: D5.2 IC1.14 P6.4
NetD6_1: D6.1 R19.2
NetD6_2: D6.2 IC1.13 P6.5
NetD8_1: D8.1 F2.1
NetD9_1: D9.1 R26.2
NetD10_1: D10.1 R27.2
NetD11_1: D11.1 R28.2
NetF1_0: F1.0 J1.1
NetF2_0: F2.0 P7.2
NetJ1_2: J1.2 U2.4
NetJ1_3: J1.3 U2.6
NetP2_1: P2.1 R12.1
NetP2_3: P2.3 R10.1 U6.3
NetP4_1: P4.1 R14.2
NetQ1_1: Q1.1 R8.2
NetQ2_1: Q2.1 R9.2
NetQ3_1: Q3.1 R15.2
NetR6_1: R6.1 U1.14
NetR7_1: R7.1 U1.13
NetR20_2: R20.2 R21.1
NetR21_2: R21.2 R24.1 U7.5
NetR22_2: R22.2 R25.1 U7.3
NetU6_2: U6.2 VR1.2
R1_KEYPAD: P1.1 U4.4
R2_KEYPAD: P1.2 U4.5
R3_KEYPAD: P1.3 U4.6
R4_KEYPAD: P1.4 U4.7
RTS: Q1.2 R6.2 R9.1
VCC: C17.2 C18.2 C19.2 C23.1 D8.2 R22.1 R28.1 U7.2
VIN: C15.1 C16.1 L1.2 R20.1 SW1.1 SW1.6
pads on no net: *1.4 *1.5 *1.17 *1.18 *1.19 *1.20 *1.21 *1.22 *1.23 *1.32 *1.39 H1.1 H2.1 H3.1 H4.1 IC1.5 IC1.6 IC1.7 IC1.10 IC1.11 IC1.12 J1.4 J1.MH1 J1.MH2 U1.7 U1.8 U1.9 U1.10 U1.11 U1.12 U1.15 U4.13 U5.1 U5.3 U5.4 U5.5 U5.6 U5.7 U5.8 U5.9 U5.10 U5.11 U5.12 U6.5 U6.6 U6.7 U7.9

## Silkscreen, mask and mechanical layers (free items; w line width, h text height)
Top Overlay:
  the board outline again, w0.2

## Text inside footprints (layer, text, board x,y; h text height)
*1: Mechanical 13 "ANTENNA" at 87.505,24.465 h1.78 r270
B3: Bottom Overlay "+" at 17.8,36.24 h2.86 r180
J1: Mechanical 2 "PCB Edge" at 85.5,45.9 h0.41 r90
U1: Top Overlay "16" at 60.945,53.15 h0.89 r90; Top Overlay "9" at 71.909,53.878 h0.89 r90; Top Overlay "8" at 72.032,45.984 h0.89 r90; Top Overlay "1" at 61.072,45.911 h0.89 r90
U6: Top Overlay "8" at 14.4,43.455 h0.51 r270; Top Overlay "1" at 14.502,52.421 h0.51 r270